# Altium PCB NB3000XN.PcbDoc (part 35 of 71)
Units mil, origin at the board's own origin, x right, y up, seen from the top; angles counter-clockwise.
Board outline 9527.56 x 6929.77 mil, 6 copper layers (Top Layer, GND+SHIELD, MidLayer1, MidLayer2, P2 - 3V3+5V0, Bottom Layer), stack 62.375 mil thick; 832 components, 1027 nets, 4655 pads, 4981 vias.
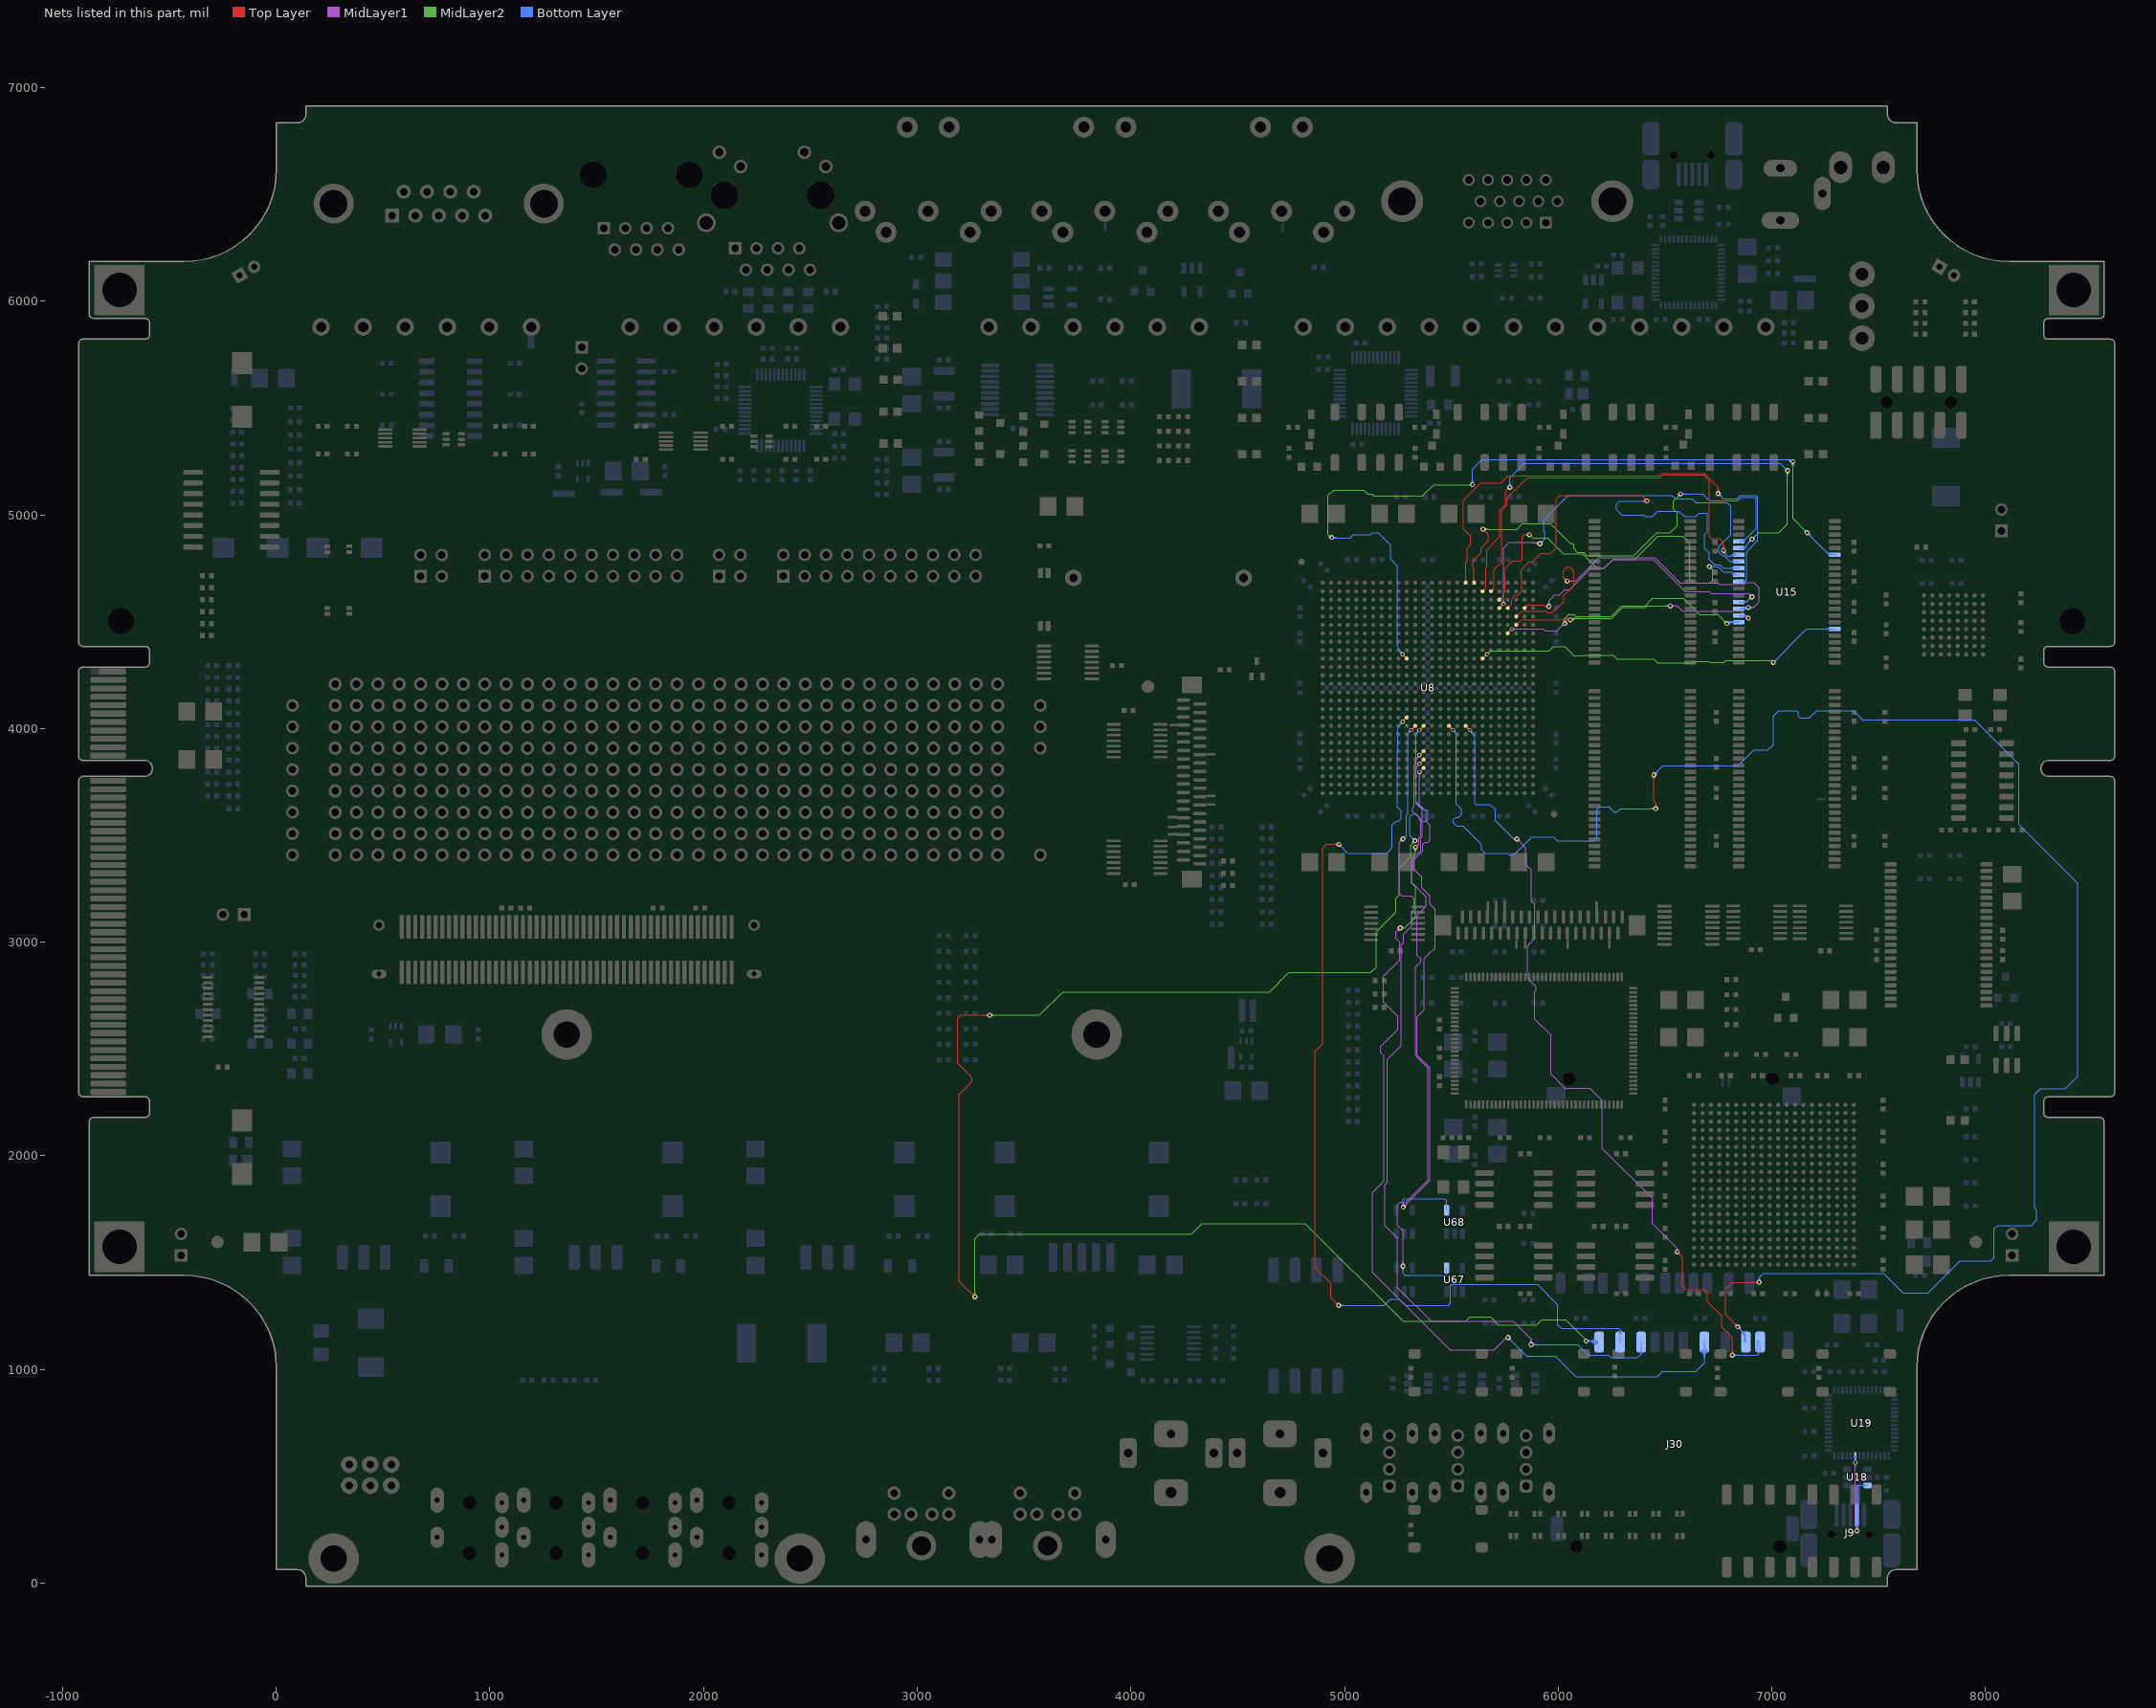
[diagram p39: the nets of this part, all layers, seen from the top]

## Via types
v1: diameter 23, hole 11.81, Top Layer to Bottom Layer, 3672 vias
v2: diameter 26, hole 11.81, Top Layer to Bottom Layer, 461 vias
v3: diameter 19, hole 11.81, Top Layer to Bottom Layer, tented both sides, 396 vias
v4: diameter 23.62, hole 11.81, Top Layer to Bottom Layer, 288 vias
v5: diameter 20, hole 11.81, Top Layer to Bottom Layer, 91 vias
v6: diameter 23, hole 11.81, Top Layer to Bottom Layer, tented both sides, 50 vias
v7: diameter 31, hole 11.81, Top Layer to Bottom Layer, 15 vias
v8: diameter 27.56, hole 11.81, Top Layer to Bottom Layer, tented both sides, 4 vias
v9: diameter 29, hole 11.81, Top Layer to Bottom Layer, 3 vias
v10: diameter 21, hole 11.81, Top Layer to Bottom Layer, 1 vias

## Nets (pads, with @x,y where several pads share a name; then routed paths per layer and width w, separated by ;. In a path a pad name is that pad's centre, name@x,y a point inside that pad or via, vN(x,y) a via of type N, cw(c..) or ccw(c..) an arc to the next point about the centre after c; other vN are vias at no path point) (continued)
DB_SRAM2.D8: U8.G23 U15.29 | length 1778.3
  Top Layer w4: U8.G23@5764.02,4445.91 v3(5783.7,4465.59) ; U8.G23@5764.02,4453.25 ccw(c5764.02,4470.97) 5776.55,4458.44 ccw(c5789.08,4445.91) U8.G23@5771.36,4445.91 ; U8.G23@5764.02,4453.41 ccw(c5764.02,4471.51) 5776.82,4458.71 ccw(c5789.62,4445.91) U8.G23@5771.52,4445.91 ; 5770.9,4452.79 cw(c5783.7,4439.98) 5783.7,4458.09 ccw(c5783.7,4439.98) 5770.9,4452.79 ; 5770.9,4452.79 ccw(c5758.09,4465.59) 5776.2,4465.59 cw(c5758.09,4465.59) 5770.9,4452.79
  MidLayer1 w4: v3(5783.7,4465.59) 5861.38,4465.59 5910,4465.59 5920,4465.59 5924.74,4465.59 5928.74,4465.59 5931.86,4465.59 5931.86,4465.37 5938.86,4458.37 5992.86,4458.37 6026.19,4491.71 v1(6031.86,4491.71) ; v3@5788.89,4460.4 cw(c5801.43,4447.86) 5801.43,4465.59 cw(c5801.43,4483.32) v3@5788.89,4470.78 ; 6005.97,4471.48 cw(c6031.86,4445.59) v1@6031.86,4482.21 ; 6012.79,4478.31 cw(c6031.86,4459.25) v1@6031.86,4486.21 ; 6019.62,4485.14 cw(c6031.86,4472.91) v1@6031.86,4490.21 ; 6019.65,4485.16 ccw(c6013.1,4491.71) v1@6022.36,4491.71 ; 5801.81,4465.59 cw(c5801.81,4483.7) 5789,4470.89 ccw(c5801.81,4483.7) 5801.81,4465.59 ; 5801.81,4465.59 ccw(c5801.81,4447.48) 5789,4460.29 cw(c5801.81,4447.48) 5801.81,4465.59
  MidLayer2 w4: v1@6025.14,4498.43 ccw(c6008.92,4514.64) 6031.86,4514.64 ccw(c6054.79,4514.64) v1@6038.57,4498.43 ; v1@6027.97,4495.6 ccw(c6018.58,4504.99) 6031.86,4504.99 ccw(c6045.14,4504.99) v1@6035.75,4495.6 ; v1(6031.86,4491.71) 6031.86,4516.71 6048.52,4533.37 6073.52,4533.37 6081.86,4525.04 6248.52,4525.04 6298.52,4575.04 6406.86,4575.04 6441.52,4609.71 6585.88,4609.71 6640.29,4555.29 ; 6640,4555 6661.29,4533.71 6747.19,4533.71 v1(6789.19,4491.71) ; v1@6779.69,4491.71 ccw(c6756.76,4491.71) 6772.97,4507.93 ccw(c6789.19,4524.14) v1@6789.19,4501.21 ; v1@6783.69,4491.71 ccw(c6770.41,4491.71) 6779.8,4501.1 ccw(c6789.19,4510.49) v1@6789.19,4497.21
  Bottom Layer w4: v1@6787.42,4493.48 cw(c6803.27,4477.63) 6803.27,4500.04 ; v1(6789.19,4491.71) 6797.52,4500.04 6845.59,4500.04 6848.52,4500.04 6848.52,4498.27 U15.29@6845.59,4498.27 ; v1@6790.25,4490.65 cw(c6812.93,4467.97) 6812.93,4500.04 ; v1@6793.08,4487.82 cw(c6822.59,4458.31) U15.29@6822.59,4500.04 ; v1@6795.91,4484.99 cw(c6832.24,4448.66) U15.29@6832.24,4500.04 ; 6804.43,4500.04 cw(c6804.43,4474.67) U15.29@6822.37,4492.61 ; 6813,4500.04 ccw(c6813,4513.3) U15.29@6822.37,4503.92 ; 6814.09,4500.04 cw(c6814.09,4484.33) U15.29@6825.2,4495.44
DB_SRAM2.D9: U8.F24 U15.30 | length 1657.7
  Top Layer w4: 6036.02,4516.71 cw(c6036.02,4499.6) v1@6051.79,4506.24 ; 6042.05,4516.71 cw(c6042.05,4502.14) v1@6055.47,4507.79 ; 6048.07,4516.71 cw(c6048.07,4504.68) v1@6059.16,4509.34 ; v1@6048.1,4504.69 ccw(c6030,4497.07) 6030,4516.71 ; v1(6056.86,4508.37) 6048.52,4516.71 6030,4516.71 ; 5815.92,4497.81 cw(c5843.27,4470.46) 5843.27,4509.14 ; 5815.92,4497.81 cw(c5843.27,4470.46) 5843.27,4509.14 ; 5815.92,4497.81 cw(c5803.39,4510.34) 5803.39,4492.62 ccw(c5803.39,4510.34) 5815.92,4497.81 ; 5815.92,4497.81 ccw(c5828.45,4485.28) 5810.73,4485.28 cw(c5828.45,4485.28) 5815.92,4497.81 ; 5843.27,4509.14 5910,4509.14 5920,4509.14 5924.74,4509.14 6022.43,4509.14 6030,4516.71
  MidLayer1 w4: v1(6525.19,4573.37) 6558.52,4573.37 6581.86,4550.04 6856.86,4550.04 v1(6890.19,4516.71) ; v1@6529.08,4569.49 cw(c6538.47,4560.1) 6538.47,4573.37 cw(c6538.47,4586.65) v1@6529.08,4577.26 ; v1@6531.91,4566.66 cw(c6548.13,4550.44) 6548.13,4573.37 cw(c6548.13,4596.31) v1@6531.91,4580.09 ; v1@6880.69,4516.71 ccw(c6857.76,4516.71) 6873.97,4532.93 ccw(c6890.19,4549.14) v1@6890.19,4526.21 ; v1@6884.69,4516.71 ccw(c6871.41,4516.71) 6880.8,4526.1 ccw(c6890.19,4535.49) v1@6890.19,4522.21
  MidLayer2 w4: v1@6055.09,4510.14 cw(c6070.94,4494.29) 6070.94,4516.71 ; v1(6056.86,4508.37) 6065.19,4516.71 6251.52,4516.71 6301.52,4566.71 6405,4566.71 6409.84,4566.71 6416.51,4573.37 v1(6525.19,4573.37) v1@6518.52,4566.71 ; v1@6057.92,4507.31 cw(c6080.6,4484.64) 6080.6,4516.71 ; v1@6060.75,4504.49 cw(c6090.25,4474.98) 6090.25,4516.71 ; v1@6063.57,4501.66 cw(c6099.91,4465.32) 6099.91,4516.71 ; v1@6518.47,4566.66 ccw(c6502.26,4550.44) 6502.26,4573.37 ccw(c6502.26,4596.31) v1@6518.47,4580.09 ; v1@6521.3,4569.49 ccw(c6511.91,4560.1) 6511.91,4573.37 ccw(c6511.91,4586.65) v1@6521.3,4577.26
  Bottom Layer w4: U15.30@6845.59,4529.76 6877.14,4529.76 ; U15.30@6870.05,4525.71 cw(c6877.14,4521.54) 6877.14,4529.76 ; U15.30@6870.05,4533.82 ccw(c6877.14,4537.99) 6877.14,4529.76 ; v1(6890.19,4516.71) 6877.14,4529.76
DB_SRAM2.D10: U8.E24 U15.31 | length 2064.2
  Top Layer w4: v1@6032.36,4690.04 ccw(c6009.42,4690.04) 6025.64,4706.26 ccw(c6041.86,4722.48) v1@6041.86,4699.54 ; v1@6036.36,4690.04 ccw(c6023.08,4690.04) 6032.47,4699.43 ccw(c6041.86,4708.82) v1@6041.86,4695.54 ; v1(6041.86,4690.04) 6023.52,4708.37 6023.52,4737.71 6040.82,4755 6053.23,4755 6073.52,4734.71 6073.52,4670.71 6026.19,4623.37 6026.19,4594.37 5973.52,4541.71 5947.98,4541.71 5941.18,4548.51 5924.74,4548.51 5920,4548.51 5910,4548.51 5843.27,4548.51 ; 5815.92,4537.18 cw(c5843.27,4509.83) 5843.27,4548.51 ; 5815.92,4537.18 cw(c5843.27,4509.83) 5843.27,4548.51 ; 5815.92,4537.18 cw(c5803.39,4549.71) 5803.39,4531.99 ccw(c5803.39,4549.71) 5815.92,4537.18 ; 5815.92,4537.18 ccw(c5828.45,4524.65) 5810.73,4524.65 cw(c5828.45,4524.65) 5815.92,4537.18
  MidLayer1 w4: v1(6041.86,4690.04) 6083.19,4690.04 6193.19,4800.04 6452.86,4800.04 6571.19,4681.71 6748.52,4681.71 6755.19,4675.04 6873.52,4675.04 6881.86,4683.37 6915.19,4683.37 6940.19,4658.37 6940.19,4591.71 6915.19,4566.71 v1(6890.19,4566.71) ; v1@6045.75,4686.15 cw(c6055.14,4676.76) 6055.14,4690.04 cw(c6055.14,4703.32) v1@6045.75,4693.93 ; v1@6048.57,4683.32 cw(c6064.79,4667.11) 6064.79,4690.04 cw(c6064.79,4712.98) v1@6048.57,4696.76 ; v1@6894.08,4562.82 cw(c6903.47,4553.43) 6903.47,4566.71 cw(c6903.47,4579.99) v1@6894.08,4570.6 ; v1@6896.91,4559.99 cw(c6913.13,4543.77) 6913.13,4566.71 cw(c6913.13,4589.64) v1@6896.91,4573.43
  Bottom Layer w4: U15.31@6845.59,4561.26 6884.74,4561.26 v1(6890.19,4566.71) ; U15.31@6854.1,4561.26 ccw(c6854.1,4602.8) v1@6883.47,4573.43 ; U15.31@6863.76,4561.26 ccw(c6863.76,4593.14) v1@6886.3,4570.6 ; U15.31@6868.81,4555.6 cw(c6882.46,4541.94) 6882.46,4561.26 cw(c6882.46,4580.57) U15.31@6868.81,4566.92 ; 6873.41,4561.26 ccw(c6873.41,4583.48) v1@6889.13,4567.77
DB_SRAM2.D11: U8.D25 U15.32 | length 1589
  Top Layer w4: v1@5948.52,4567.16 ccw(c5940.86,4562.98) 5940.86,4571.71 ; v1@5948.52,4576.26 cw(c5940.86,4580.43) 5940.86,4571.71 ; v1(5956.86,4571.71) 5940.86,4571.71 ; 5855.29,4576.55 cw(c5862.47,4569.37) 5862.47,4579.52 ; 5855.29,4576.55 cw(c5862.47,4569.37) 5862.47,4579.52 ; 5855.29,4576.55 ccw(c5867.83,4564.02) 5850.1,4564.02 cw(c5867.83,4564.02) 5855.29,4576.55 ; 5855.29,4576.55 cw(c5842.76,4589.08) 5842.76,4571.36 ccw(c5842.76,4589.08) 5855.29,4576.55 ; 5862.47,4579.52 5910,4579.52 5920,4579.52 5924.74,4579.52 5933.04,4579.52 5940.86,4571.71
  MidLayer1 w4: v1@5950.14,4578.43 ccw(c5933.92,4594.64) 5956.86,4594.64 ccw(c5979.79,4594.64) v1@5963.57,4578.43 ; v1@5952.97,4575.6 ccw(c5943.58,4584.99) 5956.86,4584.99 ccw(c5970.14,4584.99) v1@5960.75,4575.6 ; v1(5956.86,4571.71) 5956.86,4597.71 5984.19,4625.04 6006.86,4625.04 6031.86,4650.04 6054.52,4650.04 6154.52,4750.04 6215.19,4750.04 6256.86,4791.71 6445.19,4791.71 6595.19,4641.71 6706.86,4641.71 6715.19,4633.37 6890.19,4633.37 v1(6906.86,4616.71) ; v1@6897.36,4616.71 ccw(c6874.42,4616.71) 6890.64,4632.93 ccw(c6906.86,4649.14) v1@6906.86,4626.21 ; v1@6901.36,4616.71 ccw(c6888.08,4616.71) 6897.47,4626.1 ccw(c6906.86,4635.49) v1@6906.86,4622.21
  Bottom Layer w4: U15.32@6845.59,4592.75 6882.9,4592.75 v1(6906.86,4616.71) ; U15.32@6868.81,4587.1 cw(c6882.46,4573.44) 6882.46,4592.75 cw(c6882.46,4612.07) U15.32@6868.81,4598.41 ; v1@6897.36,4616.71 cw(c6874.42,4616.71) 6890.64,4600.49 cw(c6906.86,4584.27) v1@6906.86,4607.21 ; v1@6901.36,4616.71 cw(c6888.08,4616.71) 6897.47,4607.32 cw(c6906.86,4597.93) v1@6906.86,4611.21
DB_SRAM2.D12: U8.A18 U15.35 | length 2578.4
  Top Layer w4: U8.A18@5561.86,4687.43 ccw(c5549.06,4700.23) 5567.17,4700.23 ccw(c5585.27,4700.23) U8.A18@5572.47,4687.43 ; U8.A18@5561.97,4687.32 ccw(c5549.44,4699.85) 5567.17,4699.85 ccw(c5584.89,4699.85) U8.A18@5572.36,4687.32 ; U8.A18@5567.17,4682.13 5567.17,4710 5567.17,4720 5567.17,4724.74 5567.17,4777.64 5574.52,4785 5574.52,4845.71 5590.19,4861.37 5590.19,4900.04 5558.52,4931.71 5556.52,4933.71 5556.52,5068.35 5638.21,5150.04 5731.86,5150.04 5765.19,5183.37 6475.35,5183.37 6486.69,5194.71 6683.21,5194.71 6699.27,5178.64 6748.52,5129.39 v1(6748.52,5100.04) ; v1@6741.81,5106.76 ccw(c6725.59,5122.98) 6748.52,5122.98 ccw(c6771.46,5122.98) v1@6755.24,5106.76 ; v1@6744.64,5103.93 ccw(c6735.25,5113.32) 6748.52,5113.32 ccw(c6761.8,5113.32) v1@6752.41,5103.93
  Bottom Layer w4: v1@6748.52,5090.54 cw(c6748.52,5067.61) 6764.74,5083.82 cw(c6780.96,5100.04) v1@6758.02,5100.04 ; v1@6748.52,5094.54 cw(c6748.52,5081.26) 6757.91,5090.65 cw(c6767.3,5100.04) v1@6754.02,5100.04 ; v1(6748.52,5100.04) 6773.52,5075.04 6822.52,5075.04 6837.21,5075.04 6853.88,5091.71 6924.52,5091.71 6934.52,5081.71 6934.52,4880.71 6881.86,4828.04 6881.86,4695.24 ; U15.35@6845.59,4687.24 6873.86,4687.24 6881.86,4695.24 ; U15.35@6863.15,4687.24 ccw(c6868.38,4695) 6875,4688.38 ; U15.35@6865.39,4690.56 ccw(c6871.15,4699.09) 6878.43,4691.81 ; U15.35@6867.62,4693.87 ccw(c6873.91,4703.19) 6881.86,4695.24
DB_SRAM2.D13: U8.C22 U15.36 | length 2161.1
  Top Layer w4: 5804.97,4785.01 5801.16,4785.01 ; 5831.86,4855.37 5831.86,4790.71 5831.52,4790.37 ; v1@5858.47,4900.32 ccw(c5842.26,4884.11) 5842.26,4907.04 ccw(c5842.26,4929.98) v1@5858.47,4913.76 ; v1@5861.3,4903.15 ccw(c5851.91,4893.76) 5851.91,4907.04 ccw(c5851.91,4920.32) v1@5861.3,4910.93 ; v1@5873.52,4905.37 5871.86,4907.04 v1(5865.19,4907.04) 5841.84,4907.04 5831.52,4896.73 5831.52,4790.37 ; 5737.18,4615.92 ccw(c5709.83,4643.27) 5748.51,4643.27 ; 5737.18,4615.92 ccw(c5709.83,4643.27) 5748.51,4643.27 ; 5737.18,4615.92 ccw(c5749.71,4603.39) 5731.99,4603.39 cw(c5749.71,4603.39) 5737.18,4615.92 ; 5737.18,4615.92 cw(c5724.65,4628.45) 5724.65,4610.73 ccw(c5724.65,4628.45) 5737.18,4615.92 ; 5748.51,4643.27 5748.51,4710 5748.51,4720 5748.51,4724.74 5748.51,4732.36 5748.51,4746.44 5787.08,4785.01 5801.16,4785.01 ; 5801.19,4785.04 5826.19,4785.04 5831.52,4790.37
  MidLayer2 w4: 5873.52,4898.71 v1(5865.19,4907.04) 5880.86,4891.37 5951.15,4891.37 6025.49,4817.04 6065,4817.04 6115,4817.04 6182,4750.04 6215.04,4750.04 6256.71,4791.71 6359.19,4791.71 6467.52,4900.04 6581.86,4900.04 6615.19,4866.71 6615.19,4700.04 6633.52,4681.71 6710,4681.71 6723.52,4695.23 6723.52,4741.71 v1(6706.86,4758.37) ; v1@6706.86,4748.87 cw(c6706.86,4725.94) 6723.07,4742.16 cw(c6739.29,4758.37) v1@6716.36,4758.37 ; v1@6706.86,4752.87 cw(c6706.86,4739.6) 6716.25,4748.99 cw(c6725.64,4758.37) v1@6712.36,4758.37
  Bottom Layer w4: v1(6706.86,4758.37) 6747.19,4758.37 6773.52,4732.04 6810,4732.04 6823.3,4718.74 U15.36@6845.59,4718.74 ; v1@6710.75,4754.49 cw(c6720.14,4745.1) 6720.14,4758.37 cw(c6720.14,4771.65) v1@6710.75,4762.26 ; v1@6713.57,4751.66 cw(c6729.79,4735.44) 6729.79,4758.37 cw(c6729.79,4781.31) v1@6713.57,4765.09 ; 6812.37,4729.68 ccw(c6821.75,4739.06) U15.36@6825.67,4726.38 ; 6817.06,4724.99 ccw(c6823.96,4731.89) U15.36@6826.85,4722.56 ; 6817.72,4724.32 cw(c6812.14,4718.74) U15.36@6820.03,4718.74
DB_SRAM2.D14: U8.D23 U15.37 | length 2295.3
  Top Layer w4: v1@6405.69,5065.37 ccw(c6382.76,5065.37) 6398.97,5081.59 ccw(c6415.19,5097.81) v1@6415.19,5074.87 ; v1@6409.69,5065.37 ccw(c6396.41,5065.37) 6405.8,5074.76 ccw(c6415.19,5084.15) v1@6415.19,5070.87 ; v1(6415.19,5065.37) 6388.86,5091.71 6006.86,5091.71 5990.19,5075.04 5990.19,4845.44 5962.25,4817.5 5947.75,4817.5 5945.25,4820 5919.9,4820 5879.44,4779.54 5864.34,4779.54 5827.25,4742.45 5827.25,4720 5827.25,4710 5827.25,4643.27 cw(c5817.1,4643.27) 5824.28,4636.09 5824.27,4635.87 5816.36,4627.95 cw(c5803.39,4642.76) 5803.39,4623.07 ccw(c5803.39,4603.38) 5783.7,4603.39 5783.7,4591.94 cw(c5764.02,4591.94) 5777.94,4578.03 5777.94,4577.94 5776.55,4576.55 ; 5776.55,4576.55 ccw(c5789.08,4564.02) 5771.36,4564.02 cw(c5789.08,4564.02) 5776.55,4576.55 ; 5776.55,4576.55 cw(c5764.02,4589.08) 5764.02,4571.36 ccw(c5764.02,4589.08) 5776.55,4576.55
  Bottom Layer w4: v1@6408.47,5058.66 ccw(c6392.26,5042.44) 6392.26,5065.37 ccw(c6392.26,5088.31) v1@6408.47,5072.09 ; v1@6411.3,5061.49 ccw(c6401.91,5052.1) 6401.91,5065.37 ccw(c6401.91,5078.65) v1@6411.3,5069.26 ; v1(6415.19,5065.37) 6288.52,5065.37 6273.52,5050.37 6273.52,5025.04 6298.52,5000.04 6398.52,5000.04 6406.86,4991.71 6440.19,4991.71 6465.19,5016.71 6565.19,5016.71 6590.19,4991.71 6644.86,4991.71 6661.52,5008.37 6690.86,5008.37 6698.52,5000.71 6698.52,4920.71 6684.52,4906.71 6684.52,4843.37 6706.86,4821.04 6706.86,4791.71 6731.86,4766.71 6757.05,4766.71 6773.52,4750.23 U15.37@6845.59,4750.23 ; U15.37@6822.37,4744.58 ccw(c6808.72,4730.92) 6808.72,4750.23 ccw(c6808.72,4769.55) U15.37@6822.37,4755.89
DB_SRAM2.D15: U8.D22 U15.38 | length 2252.5
  Top Layer w4: U8.D22@5724.65,4564.02 v3(5744.33,4583.7) ; U8.D22@5724.65,4571.36 ccw(c5724.65,4589.08) 5737.18,4576.55 ccw(c5749.71,4564.02) U8.D22@5731.99,4564.02 ; U8.D22@5724.65,4571.52 ccw(c5724.65,4589.62) 5737.45,4576.82 ccw(c5750.25,4564.02) U8.D22@5732.15,4564.02 ; 5731.53,4570.9 cw(c5744.33,4558.09) 5744.33,4576.2 ccw(c5744.33,4558.09) 5731.53,4570.9 ; 5731.53,4570.9 ccw(c5718.72,4583.7) 5736.83,4583.7 cw(c5718.72,4583.7) 5731.53,4570.9
  MidLayer1 w4: v3@5739.14,4588.89 ccw(c5726.6,4601.43) 5744.33,4601.43 ccw(c5762.06,4601.43) v3@5749.52,4588.89 ; v3(5744.33,4583.7) 5744.33,4661.38 5744.33,4710 5744.33,4720 5744.33,4845.22 5771.82,4872.71 5877.33,4872.71 5880,4870.04 ; 5889.63,4870.04 cw(c5889.63,4839.74) v1@5911.1,4861.12 ; 5899.26,4870.04 cw(c5899.26,4849.32) v1@5913.94,4863.94 ; 5904.23,4870.04 ccw(c5904.23,4875.77) v1@5908.28,4871.72 ; v1@5908.27,4858.3 ccw(c5880,4830.15) 5880,4870.04 ; v1@5915,4867.56 5912.52,4870.04 5880,4870.04 ; 5744.33,4601.81 cw(c5726.22,4601.81) 5739.03,4589 ccw(c5726.22,4601.81) 5744.33,4601.81 ; 5744.33,4601.81 ccw(c5762.44,4601.81) 5749.63,4589 cw(c5762.44,4601.81) 5744.33,4601.81
  Bottom Layer w4: v1(5915,4865) 5937.5,4887.5 5937.5,4917.25 5931.86,4922.89 5931.86,4977.39 6046.17,5091.71 6531.86,5091.71 6548.52,5075.04 6627.17,5075.04 6643.84,5058.37 6790.86,5058.37 6807.52,5041.71 6807.52,4908.37 6752.86,4853.71 6752.86,4825.04 6769.52,4808.37 6777.21,4808.37 6803.86,4781.73 U15.38@6845.59,4781.73 ; v1@5915,4870.5 ccw(c5915,4883.78) 5924.39,4874.39 ccw(c5933.78,4865) v1@5920.5,4865 ; v1@5915,4874.5 ccw(c5915,4897.43) 5931.22,4881.22 ccw(c5947.43,4865) v1@5924.5,4865 ; U15.38@6822.37,4776.07 ccw(c6808.72,4762.42) 6808.72,4781.73 ccw(c6808.72,4801.04) U15.38@6822.37,4787.39
DB_SRAM2.NBHE: U8.B20 U15.40 | length 2900.4
  Top Layer w4: v1@5764.02,5129.04 cw(c5741.09,5129.04) 5757.31,5112.82 cw(c5773.52,5096.61) v1@5773.52,5119.54 ; v1@5768.02,5129.04 cw(c5754.75,5129.04) 5764.14,5119.65 cw(c5773.52,5110.26) v1@5773.52,5123.54 ; v1(5773.52,5129.04) 5753,5108.52 5753,5048.87 5727.52,5023.39 5727.52,4898.58 5665.19,4836.25 5665.19,4770 5665.19,4755.91 5661.41,4752.13 5661.41,4751.22 5661.41,4745 5661.41,4720 5661.41,4710 5661.41,4662.47 ; 5658.44,4655.29 ccw(c5651.26,4662.47) 5661.41,4662.47 ; 5658.44,4655.29 ccw(c5651.26,4662.47) 5661.41,4662.47 ; 5658.44,4655.29 cw(c5645.91,4667.83) 5645.91,4650.1 ccw(c5645.91,4667.83) 5658.44,4655.29 ; 5658.44,4655.29 ccw(c5670.97,4642.76) 5653.25,4642.76 cw(c5670.97,4642.76) 5658.44,4655.29
  MidLayer2 w4: v1(6906.86,4886.71) 6937.19,4917.04 7032.52,4917.04 ; v1@6906.86,4892.21 ccw(c6906.86,4905.49) 6916.25,4896.1 ccw(c6925.64,4886.71) v1@6912.36,4886.71 ; v1@6906.86,4896.21 ccw(c6906.86,4919.14) 6923.07,4902.93 ccw(c6939.29,4886.71) v1@6916.36,4886.71 ; v1@7066.81,5200.99 cw(c7050.59,5184.77) 7073.52,5184.77 cw(c7096.46,5184.77) v1@7080.24,5200.99 ; v1@7069.64,5203.82 cw(c7060.25,5194.43) 7073.52,5194.43 cw(c7086.8,5194.43) v1@7077.41,5203.82 ; v1(7073.52,5207.71) 7073.52,4958.04 7044.59,4929.11 ; 7032.52,4917.04 7044.59,4929.11 ; 7032.52,4917.04 7044.59,4929.11
  Bottom Layer w4: v1@5766.81,5135.76 ccw(c5750.59,5151.98) 5773.52,5151.98 ccw(c5796.46,5151.98) v1@5780.24,5135.76 ; v1@5769.64,5132.93 ccw(c5760.25,5142.32) 5773.52,5142.32 ccw(c5786.8,5142.32) v1@5777.41,5132.93 ; v1(5773.52,5129.04) 5773.52,5175.04 5840.19,5241.71 7039.52,5241.71 v1(7073.52,5207.71) ; U15.40@6845.59,4844.72 6873.15,4844.72 6881.15,4852.72 ; U15.40@6863.15,4844.72 ccw(c6868.03,4852.04) 6874.25,4845.82 ; U15.40@6865.37,4848.05 ccw(c6870.79,4856.18) 6877.7,4849.27 ; U15.40@6867.59,4851.38 ccw(c6873.55,4860.32) 6881.15,4852.72 ; v1@6897.36,4886.71 cw(c6874.42,4886.71) 6890.64,4870.49 cw(c6906.86,4854.27) v1@6906.86,4877.21 ; v1@6901.36,4886.71 cw(c6888.08,4886.71) 6897.47,4877.32 cw(c6906.86,4867.93) v1@6906.86,4881.21 ; v1(6906.86,4886.71) 6881.15,4861 6881.15,4852.72 ; v1@7064.02,5207.71 ccw(c7041.09,5207.71) 7057.31,5223.93 ccw(c7073.52,5240.14) v1@7073.52,5217.21 ; v1@7068.02,5207.71 ccw(c7054.75,5207.71) 7064.14,5217.1 ccw(c7073.52,5226.49) v1@7073.52,5213.21
DB_SRAM2.NBLE: U8.B21 U15.39 | length 2198.4
  Top Layer w4: v1@6766.81,4840.09 ccw(c6750.59,4856.31) 6773.52,4856.31 ccw(c6796.46,4856.31) v1@6780.24,4840.09 ; v1@6769.64,4837.26 ccw(c6760.25,4846.65) 6773.52,4846.65 ccw(c6786.8,4846.65) v1@6777.41,4837.26 ; v1(6773.52,4833.37) 6773.52,4871.37 6755.19,4889.71 6715.19,4889.71 6706.86,4898.04 6706.86,5159.75 6691.56,5175.04 6679.9,5186.71 6520.19,5186.71 6505,5186.71 6490,5186.71 6478.33,5175.04 5856.86,5175.04 5761,5079.18 5761,5045.56 5735.52,5020.08 5735.52,4778.71 5700.78,4743.97 5700.78,4724.74 5700.78,4720 5700.78,4710 5700.78,4662.47 ; 5697.81,4655.29 ccw(c5690.63,4662.47) 5700.78,4662.47 ; 5697.81,4655.29 ccw(c5690.63,4662.47) 5700.78,4662.47 ; 5697.81,4655.29 cw(c5685.28,4667.83) 5685.28,4650.1 ccw(c5685.28,4667.83) 5697.81,4655.29 ; 5697.81,4655.29 ccw(c5710.34,4642.76) 5692.62,4642.76 cw(c5710.34,4642.76) 5697.81,4655.29
  Bottom Layer w4: v1(6773.52,4833.37) 6773.52,4825.04 6792.34,4806.23 6809.03,4806.23 6816.03,4813.23 ; v1@6774.97,4832.98 ccw(c6787.75,4829.53) 6778.39,4820.17 ; v1@6778.83,4831.94 ccw(c6795.45,4827.46) 6783.28,4815.28 ; v1@6782.7,4830.9 ccw(c6803.15,4825.38) 6788.17,4810.39 ; 6807.64,4804.84 cw(c6820.95,4791.53) U15.39@6826.79,4809.42 ; 6810.03,4807.23 cw(c6816.38,4800.88) U15.39@6822.54,4807.41 ; 6812.25,4809.45 cw(c6823.22,4798.48) 6828.03,4813.23 ccw(c6822.03,4806.87) 6815.86,4813.05 ; 6812.94,4810.14 cw(c6819.21,4803.88) U15.39@6825.29,4810.32 ; 6816.86,4814.06 cw(c6825.49,4805.43) U15.39@6829.27,4817.03 ; U15.39@6820.65,4810.15 ccw(c6816.03,4808.23) 6816.03,4813.23 ; U15.39@6820.65,4816.3 cw(c6816.03,4818.23) 6816.03,4813.23 ; U15.39@6845.59,4813.23 6816.03,4813.23
DB_SRAM2.NCS: U8.K11 U15.6 | length 4588.6
  Top Layer w4: v3(5271.89,4347.48) U8.K11@5291.57,4327.8 ; U8.K11@5284.07,4327.8 ccw(c5265.97,4327.8) 5278.77,4340.6 ccw(c5291.57,4353.4) U8.K11@5291.57,4335.3 ; U8.K11@5284.23,4327.8 ccw(c5266.51,4327.8) 5279.04,4340.33 ccw(c5291.57,4352.86) U8.K11@5291.57,4335.14 ; 5284.69,4334.68 cw(c5297.5,4347.48) 5279.39,4347.48 ccw(c5297.5,4347.48) 5284.69,4334.68 ; 5284.69,4334.68 ccw(c5271.89,4321.87) 5271.89,4339.98 cw(c5271.89,4321.87) 5284.69,4334.68
  MidLayer2 w4: 4925.08,4906.82 ccw(c4933.31,4915.06) v1@4936.99,4904.01 ; 4925.98,4905.92 cw(c4915.05,4895) v1@4930.5,4895 ; 4929.65,4902.25 ccw(c4935.6,4908.2) v1@4938.26,4900.22 ; v1(4940,4895) v1@4940,4891.9 ; v1@4940.19,4891.71 v1@4940,4891.9 ; v1(5598.52,5141.71) 5416.71,5141.71 5363,5088 5138.31,5088 5128.31,5098 5108.56,5098 5089.86,5116.71 4948.52,5116.71 4923.52,5091.71 4923.52,4908.37 4938.45,4893.45 v1@4940,4891.9 ; v1@7091.81,5243.32 cw(c7075.59,5227.11) 7098.52,5227.11 cw(c7121.46,5227.11) v1@7105.24,5243.32 ; v1@7094.64,5246.15 cw(c7085.25,5236.76) 7098.52,5236.76 cw(c7111.8,5236.76) v1@7102.41,5246.15 ; v1(7098.52,5250.04) 7098.52,4983.37 v1(7165.19,4916.71) ; v1@7155.69,4916.71 ccw(c7132.76,4916.71) 7148.97,4932.93 ccw(c7165.19,4949.14) v1@7165.19,4926.21 ; v1@7159.69,4916.71 ccw(c7146.41,4916.71) 7155.8,4926.1 ccw(c7165.19,4935.49) v1@7165.19,4922.21
  Bottom Layer w4: v1(4940,4895) 4940,4891.9 4940.19,4891.71 5024.88,4891.71 5041.54,4908.37 5121.86,4908.37 5130.19,4916.71 5156.86,4916.71 5215.19,4858.37 5215.19,4793.5 5248.03,4760.66 5248.03,4720 5248.03,4710 5248.03,4503.9 5248.03,4484.48 5248.03,4410.36 5248.03,4390.86 ccw(c5289.76,4390.86) 5260.25,4361.35 ; v1@4941.06,4896.06 ccw(c4951.57,4906.57) 4951.57,4891.71 ; v1@4943.89,4898.89 ccw(c4961.23,4916.23) 4961.23,4891.71 ; v1@4946.72,4888.28 cw(c4954.99,4880.01) 4954.99,4891.71 ; v1@4946.72,4901.72 ccw(c4970.88,4925.88) 4970.88,4891.71 ; v3@5264.42,4348.13 ccw(c5246.38,4349.71) 5260.25,4361.35 ; v3@5272.54,4354.95 cw(c5274.12,4372.99) 5260.25,4361.35 ; v1@5591.81,5148.43 ccw(c5575.59,5164.64) 5598.52,5164.64 ccw(c5621.46,5164.64) v1@5605.24,5148.43 ; v1@5594.64,5145.6 ccw(c5585.25,5154.99) 5598.52,5154.99 ccw(c5611.8,5154.99) v1@5602.41,5145.6 ; v1(5598.52,5141.71) 5598.52,5213.73 5643.17,5258.37 7090.19,5258.37 v1(7098.52,5250.04) ; 7055.47,5258.37 cw(c7055.47,5206.99) v1@7091.81,5243.32 ; 7065.13,5258.37 cw(c7065.13,5216.64) v1@7094.64,5246.15 ; 7074.78,5258.37 cw(c7074.78,5226.3) v1@7097.46,5248.98 ; 7084.44,5258.37 cw(c7084.44,5235.96) v1@7100.29,5251.81 ; v1@7165.19,4907.21 cw(c7165.19,4884.27) 7181.41,4900.49 cw(c7197.63,4916.71) v1@7174.69,4916.71 ; v1@7165.19,4911.21 cw(c7165.19,4897.93) 7174.58,4907.32 cw(c7183.97,4916.71) v1@7170.69,4916.71 ; v1(7165.19,4916.71) 7265.19,4816.71 ; 7249.23,4832.67 ccw(c7276.85,4860.29) U15.6@7276.85,4821.23 ; 7256.06,4825.84 ccw(c7276.85,4846.63) U15.6@7276.85,4817.23 ; 7262.89,4819.01 ccw(c7276.85,4832.97) U15.6@7276.85,4813.23 ; 7265.94,4816.71 ccw(c7265.94,4824.14) U15.6@7271.19,4818.88 ; U15.6@7268.85,4813.1 ccw(c7265.19,4813.05) 7265.19,4816.71 ; U15.6@7294.41,4813.23 7298.52,4813.23 7298.52,4816.71 7265.19,4816.71
DB_SRAM2.NOE: U8.A19 U15.41 | length 2467.2
  Top Layer w4: U8.A19@5601.23,4687.43 ccw(c5588.43,4700.23) 5606.54,4700.23 ccw(c5624.64,4700.23) U8.A19@5611.84,4687.43 ; U8.A19@5601.34,4687.32 ccw(c5588.81,4699.85) 5606.54,4699.85 ccw(c5624.26,4699.85) U8.A19@5611.73,4687.32 ; U8.A19@5606.54,4682.13 5606.54,4710 5606.54,4720 5606.54,4724.74 5606.54,4746.05 5600.19,4752.39 5600.19,4782.37 5640.19,4822.37 5640.19,4845.19 5672.86,4877.86 5672.86,4909.04 v1(5648.52,4933.37) ; v1@5648.52,4923.87 cw(c5648.52,4900.94) 5664.74,4917.16 cw(c5680.96,4933.37) v1@5658.02,4933.37 ; v1@5648.52,4927.87 cw(c5648.52,4914.6) 5657.91,4923.99 cw(c5667.3,4933.37) v1@5654.02,4933.37
  MidLayer2 w4: v1(5648.52,4933.37) 5807.11,4933.37 5832.94,4959.21 5963.71,4959.21 6056.21,4866.71 6065.52,4866.71 6073.52,4858.71 6073.52,4842.04 6090.52,4825.04 6118.31,4825.04 6134.98,4808.37 6353.23,4808.37 6461.56,4916.71 6523.52,4916.71 6556.86,4950.04 6556.86,5010.71 6540.19,5027.37 6540.19,5065.04 v1(6572.52,5097.37) ; v1@5652.41,4929.49 cw(c5661.8,4920.1) 5661.8,4933.37 cw(c5661.8,4946.65) v1@5652.41,4937.26 ; v1@5655.24,4926.66 cw(c5671.46,4910.44) 5671.46,4933.37 cw(c5671.46,4956.31) v1@5655.24,4940.09 ; v1@6563.02,5097.37 cw(c6540.09,5097.37) 6556.31,5081.16 cw(c6572.52,5064.94) v1@6572.52,5087.87 ; v1@6567.02,5097.37 cw(c6553.75,5097.37) 6563.14,5087.99 cw(c6572.52,5078.6) v1@6572.52,5091.87
  Bottom Layer w4: v1(6572.52,5097.37) 6676.19,5097.37 6706.86,5066.71 6840.19,5066.71 6856.86,5083.37 6921.54,5083.37 6926.52,5078.39 6926.52,4936.37 6873.52,4883.37 6873.52,4876.22 U15.41@6845.59,4876.22 ; v1@6576.41,5093.49 cw(c6585.8,5084.1) 6585.8,5097.37 cw(c6585.8,5110.65) v1@6576.41,5101.26 ; v1@6579.24,5090.66 cw(c6595.46,5074.44) 6595.46,5097.37 cw(c6595.46,5120.31) v1@6579.24,5104.09 ; U15.41@6863.15,4880.22 ccw(c6863.15,4897.65) 6875.47,4885.32 ; U15.41@6863.15,4884.22 ccw(c6863.15,4911.3) 6882.3,4892.15 ; U15.41@6871.15,4876.22 cw(c6882.69,4876.22) 6874.53,4884.38
DB_SRAM2.NWE: U8.K20 U15.17 | length 1992.2
  Top Layer w4: U8.K20@5645.91,4327.8 v3(5665.59,4347.48) ; U8.K20@5645.91,4335.14 ccw(c5645.91,4352.86) 5658.44,4340.33 ccw(c5670.97,4327.8) U8.K20@5653.25,4327.8 ; U8.K20@5645.91,4335.3 ccw(c5645.91,4353.4) 5658.71,4340.6 ccw(c5671.51,4327.8) U8.K20@5653.41,4327.8 ; 5652.79,4334.68 cw(c5665.59,4321.87) 5665.59,4339.98 ccw(c5665.59,4321.87) 5652.79,4334.68 ; 5652.79,4334.68 ccw(c5639.98,4347.48) 5658.09,4347.48 cw(c5639.98,4347.48) 5652.79,4334.68
  MidLayer2 w4: v3@5666.24,4354.95 ccw(c5667.82,4372.99) 5679.46,4359.12 ccw(c5691.1,4345.25) v3@5673.06,4346.83 ; 5679.17,4358.87 cw(c5689.1,4348.94) 5689.1,4362.99 5782.64,4362.99 5910,4362.99 5920,4362.99 5924.74,4362.99 5956.86,4362.99 5977.24,4383.37 6031.86,4383.37 6074.19,4341.04 6115.19,4341.04 6116.86,4342.71 6256.86,4342.71 6274.52,4325.04 6448.52,4325.04 6465.19,4308.37 6630.52,4308.37 6637.52,4315.37 6705.19,4315.37 6711.19,4309.37 6774.19,4309.37 6783.52,4318.71 6997.52,4318.71 v1(7006.86,4309.37)
  Bottom Layer w4: v1(7006.86,4309.37) 7147.52,4450.04 7164.25,4466.77 U15.17@7294.41,4466.77 ; v1@7006.86,4314.87 ccw(c7006.86,4328.15) 7016.25,4318.76 ccw(c7025.64,4309.37) v1@7012.36,4309.37 ; v1@7006.86,4318.87 ccw(c7006.86,4341.81) 7023.07,4325.59 ccw(c7039.29,4309.37) v1@7016.36,4309.37 ; U15.17@7271.19,4461.11 ccw(c7257.54,4447.46) 7257.54,4466.77 ccw(c7257.54,4486.08) U15.17@7271.19,4472.43
DBSD.CLK: J30.5 U8.AA13 | length 5282.7
  Top Layer w4: v3(5350.63,3875.04) U8.AA13@5370.31,3894.72 ; U8.AA13@5362.81,3894.72 cw(c5344.71,3894.72) 5357.51,3881.92 cw(c5370.31,3869.12) U8.AA13@5370.31,3887.22 ; U8.AA13@5362.97,3894.72 cw(c5345.25,3894.72) 5357.78,3882.19 cw(c5370.31,3869.66) U8.AA13@5370.31,3887.38 ; 5363.43,3887.84 ccw(c5376.24,3875.04) 5358.13,3875.04 cw(c5376.24,3875.04) 5363.43,3887.84 ; 5363.43,3887.84 cw(c5350.63,3900.65) 5350.63,3882.54 ccw(c5350.63,3900.65) 5363.43,3887.84
  MidLayer1 w4: 5242.34,2902.19 5181.86,2841.71 5181.86,2720.35 5249.81,2652.4 5249.81,2592.31 5169.19,2511.69 5169.19,2483.35 5184.4,2468.14 5184.4,1881.84 5131.86,1829.29 5131.86,1454.04 5494.19,1091.71 5700.78,1091.71 5759.11,1150.04 v1(5765.19,1150.04) ; 5242.38,2902.19 5257.81,2917.62 5257.81,3000.09 5247.5,3010.4 ; 5247.5,3010.4 5240.19,3017.71 5240.19,3046.04 v1(5260.86,3066.71) ; v1@5251.36,3066.71 cw(c5228.42,3066.71) 5244.64,3050.49 cw(c5260.86,3034.27) v1@5260.86,3057.21 ; v1@5255.36,3066.71 cw(c5242.08,3066.71) 5251.47,3057.32 cw(c5260.86,3047.93) v1@5260.86,3061.21 ; 5326.77,3798.23 5326.77,3812.16 ; v1(5331.86,3445.04) 5348.52,3461.71 5348.52,3488.41 5356.86,3496.74 5356.86,3575.04 5323.52,3608.37 5320,3611.9 5320,3630 5326.77,3636.77 5326.77,3660 5326.77,3670 5326.77,3775.13 5326.77,3812.16 ; v1@5331.86,3450.54 ccw(c5331.86,3463.82) 5341.25,3454.43 ccw(c5350.64,3445.04) v1@5337.36,3445.04 ; v1@5331.86,3454.54 ccw(c5331.86,3477.48) 5348.07,3461.26 ccw(c5364.29,3445.04) v1@5341.36,3445.04 ; v3@5343.16,3874.39 cw(c5325.12,3872.81) 5338.99,3861.17 ; v3@5351.28,3867.57 ccw(c5352.86,3849.53) 5338.99,3861.17 ; 5738.6,1129.53 cw(c5765.19,1102.93) v1@5765.19,1140.54 ; 5745.43,1136.35 cw(c5765.19,1116.59) v1@5765.19,1144.54 ; 5752.25,1143.18 cw(c5765.19,1130.25) v1@5765.19,1148.54 ; 5753.27,1144.2 ccw(c5747.43,1150.04) v1@5755.69,1150.04 ; 5326.77,3812.16 5326.77,3831.66 cw(c5368.5,3831.66) 5338.99,3861.17
  MidLayer2 w4: v1(5260.86,3066.71) 5281.86,3066.71 ; v1@5264.99,3063.08 cw(c5273.01,3056.02) 5273.01,3066.71 cw(c5273.01,3077.39) v1@5264.99,3070.34 ; v1@5267.99,3060.44 cw(c5281.86,3048.25) 5281.86,3066.71 ; v1@5267.99,3072.98 ccw(c5281.86,3085.17) 5281.86,3066.71 ; v1@5325.14,3438.32 cw(c5308.92,3422.11) 5331.86,3422.11 cw(c5354.79,3422.11) v1@5338.57,3438.32 ; v1@5327.97,3441.15 cw(c5318.58,3431.76) 5331.86,3431.76 cw(c5345.14,3431.76) v1@5335.75,3441.15 ; v1(5331.86,3445.04) 5331.86,3410.71 5314.19,3393.04 5314.19,3276.04 5331.86,3258.37 5331.86,3116.71 5281.86,3066.71
  Bottom Layer w4: v1@5765.19,1140.54 cw(c5765.19,1117.61) 5781.41,1133.82 cw(c5797.63,1150.04) v1@5774.69,1150.04 ; v1@5765.19,1144.54 cw(c5765.19,1131.26) 5774.58,1140.65 cw(c5783.97,1150.04) v1@5770.69,1150.04 ; v1(5765.19,1150.04) 5837.14,1078.1 5852.23,1063 5986.19,1063 6082.48,966.71 6463.86,966.71 6488.86,991.71 6644.19,991.71 6684.53,1032.04 J30.5@6684.53,1128.35 ; J30.5@6669.79,1087.24 cw(c6634.23,1051.67) 6684.53,1051.67 cw(c6734.82,1051.67) J30.5@6699.26,1087.24 ; J30.5@6672.62,1090.06 cw(c6643.88,1061.33) 6684.53,1061.33 cw(c6725.17,1061.33) J30.5@6696.43,1090.06 ; J30.5@6675.45,1092.89 cw(c6653.54,1070.98) 6684.53,1070.98 cw(c6715.51,1070.98) J30.5@6693.6,1092.89
DBSD.CMD: J30.2 U8.V12 | length 4520.7
  Top Layer w4: v3(5311.26,3993.15) U8.V12@5330.94,4012.83 ; U8.V12@5323.44,4012.83 cw(c5305.34,4012.83) 5318.14,4000.03 cw(c5330.94,3987.23) U8.V12@5330.94,4005.33 ; U8.V12@5323.6,4012.83 cw(c5305.88,4012.83) 5318.41,4000.3 cw(c5330.94,3987.77) U8.V12@5330.94,4005.49 ; 5324.06,4005.95 cw(c5311.26,4018.76) 5311.26,4000.65 ccw(c5311.26,4018.76) 5324.06,4005.95 ; 5324.06,4005.95 ccw(c5336.87,3993.15) 5318.76,3993.15 cw(c5336.87,3993.15) 5324.06,4005.95
  MidLayer1 w4: v1@5264.02,3483.37 cw(c5241.09,3483.37) 5257.31,3467.16 cw(c5273.52,3450.94) v1@5273.52,3473.87 ; v1@5268.02,3483.37 cw(c5254.75,3483.37) 5264.14,3473.99 cw(c5273.52,3464.6) v1@5273.52,3477.87 ; v1(5273.52,3483.37) 5255.86,3465.71 5255.86,3228.37 5267.52,3216.71 5311.84,3216.71 5325.19,3203.36 5325.19,3154.04 5315.19,3144.04 5315.19,3075.04 5277.5,3037.35 5277.5,3000 5265.81,2988.31 5265.81,2517.33 5265.19,2516.71 5242.77,2494.28 5200.4,2451.92 5200.4,1875.21 5190.19,1865 5190.19,1675.04 5248.52,1616.71 5248.52,1383.37 5406.86,1225.04 5790.19,1225.04 5873.52,1141.71 v1(5873.52,1116.71) ; v1@5866.81,1123.43 ccw(c5850.59,1139.64) 5873.52,1139.64 ccw(c5896.46,1139.64) v1@5880.24,1123.43 ; v1@5869.64,1120.6 ccw(c5860.25,1129.99) 5873.52,1129.99 ccw(c5886.8,1129.99) v1@5877.41,1120.6
  Bottom Layer w4: v1(5273.52,3483.37) 5290.19,3500.04 5290.19,3594.69 5295.75,3600.25 5295.75,3660 5295.75,3670 5295.75,3876.1 5295.75,3969.64 cw(c5309.8,3969.64) 5299.87,3979.57 ; v1@5273.52,3488.87 ccw(c5273.52,3502.15) 5282.91,3492.76 ccw(c5292.3,3483.37) v1@5279.02,3483.37 ; v1@5273.52,3492.87 ccw(c5273.52,3515.81) 5289.74,3499.59 ccw(c5305.96,3483.37) v1@5283.02,3483.37 ; v3@5303.79,3992.5 cw(c5285.75,3990.92) 5299.62,3979.28 cw(c5313.49,3967.64) v3@5311.91,3985.68 ; v1(5873.52,1116.71) 6091.19,1116.71 6141.19,1066.71 6235,1066.71 6246.71,1055 6370,1055 6388.86,1073.86 ; v1@5877.41,1112.82 cw(c5886.8,1103.43) 5886.8,1116.71 cw(c5886.8,1129.99) v1@5877.41,1120.6 ; v1@5880.24,1109.99 cw(c5896.46,1093.77) 5896.46,1116.71 cw(c5896.46,1139.64) v1@5880.24,1123.43 ; J30.2@6382.79,1082.04 cw(c6380.31,1073.86) 6388.86,1073.86 ; J30.2@6388.86,1128.35 6388.86,1073.86 ; J30.2@6394.92,1082.04 ccw(c6397.4,1073.86) 6388.86,1073.86
DBSD.DAT0: J30.7 U8.V16 | length 9054.7
  Top Layer w4: U8.V16@5488.43,4005.33 cw(c5488.43,3987.23) 5501.23,4000.03 cw(c5514.03,4012.83) U8.V16@5495.93,4012.83 ; U8.V16@5488.43,4005.49 cw(c5488.43,3987.77) 5500.96,4000.3 cw(c5513.49,4012.83) U8.V16@5495.77,4012.83 ; U8.V16@5488.43,4012.83 v3(5508.11,3993.15) ; v1@6441.81,3776.66 cw(c6425.59,3760.44) 6448.52,3760.44 cw(c6471.46,3760.44) v1@6455.24,3776.66 ; v1@6444.64,3779.49 cw(c6435.25,3770.1) 6448.52,3770.1 cw(c6461.8,3770.1) v1@6452.41,3779.49 ; v1(6448.52,3783.37) 6448.52,3660 6456.86,3651.67 v1(6456.86,3625.04) ; v1@6450.14,3631.76 ccw(c6433.92,3647.98) 6456.86,3647.98 ccw(c6479.79,3647.98) v1@6463.57,3631.76 ; v1@6452.97,3628.93 ccw(c6443.58,3638.32) 6456.86,3638.32 ccw(c6470.14,3638.32) v1@6460.75,3628.93 ; v1@6830.69,1200.04 ccw(c6807.76,1200.04) 6823.97,1216.26 ccw(c6840.19,1232.48) v1@6840.19,1209.54 ; v1@6834.69,1200.04 ccw(c6821.41,1200.04) 6830.8,1209.43 ccw(c6840.19,1218.82) v1@6840.19,1205.54 ; v1(6840.19,1200.04) 6783.52,1256.71 6783.52,1375.04 6816.86,1408.37 v1(6940.19,1408.37) ; v1@6933.47,1401.66 ccw(c6917.26,1385.44) 6917.26,1408.37 ccw(c6917.26,1431.31) v1@6933.47,1415.09 ; v1@6936.3,1404.49 ccw(c6926.91,1395.1) 6926.91,1408.37 ccw(c6926.91,1421.65) v1@6936.3,1412.26 ; 5495.31,4005.95 cw(c5482.5,3993.15) 5500.61,3993.15 ccw(c5482.5,3993.15) 5495.31,4005.95 ; 5495.31,4005.95 ccw(c5508.11,4018.76) 5508.11,4000.65 cw(c5508.11,4018.76) 5495.31,4005.95
  Bottom Layer w4: v3@5507.46,3985.68 cw(c5505.88,3967.64) 5519.75,3979.28 cw(c5533.62,3990.92) v3@5515.58,3992.5 ; 5519.5,3979.57 cw(c5509.57,3969.64) 5523.62,3969.64 5523.62,3876.1 5523.62,3670 5523.62,3660 5523.62,3646.37 5546.99,3623 5546.99,3598.01 5533.98,3585 5520,3585 5510,3575 5510,3560 5525,3545 5553.69,3545 5553.69,3544.9 5641.9,3456.69 5641.9,3433.1 5657.92,3417.08 5762.44,3417.08 5769.98,3409.55 5794.34,3409.55 5876.67,3491.87 5976.66,3491.87 5994.48,3474.04 6170.21,3474.04 6182.19,3486.02 6182.19,3620.56 6195,3633.37 6238.19,3633.37 6263.19,3608.37 6273.52,3608.37 6290.19,3625.04 v1(6456.86,3625.04) ; v1(6448.52,3783.37) 6490.19,3825.04 6773.52,3825.04 6774.52,3826.04 6841.19,3826.04 6915.19,3900.04 6981.86,3900.04 7006.86,3925.04 7006.86,4058.37 7031.86,4083.37 7115.19,4083.37 7123.52,4075.04 7123.52,4058.37 7131.86,4050.04 7176.5,4050.04 7209.84,4083.37 7381.86,4083.37 7423.52,4041.71 7948.52,4041.71 8156.86,3833.37 8156.86,3550.04 8431.86,3275.04 8431.86,2371.86 8373.94,2313.94 8257.07,2313.94 8230,2286.87 8230,1757.18 8240.19,1746.99 8240.19,1700.04 8215.19,1675.04 8056.86,1675.04 8040.19,1658.37 8040.19,1525.04 8023.52,1508.37 7881.86,1508.37 7731.86,1358.37 7615.19,1358.37 7523.52,1450.04 6959.86,1450.04 6940.19,1430.37 ; v1@6448.52,3788.87 ccw(c6448.52,3802.15) 6457.91,3792.76 ccw(c6467.3,3783.37) v1@6454.02,3783.37 ; v1@6448.52,3792.87 ccw(c6448.52,3815.81) 6464.74,3799.59 ccw(c6480.96,3783.37) v1@6458.02,3783.37 ; v1@6450.14,3618.32 ccw(c6433.92,3602.11) 6433.92,3625.04 ccw(c6433.92,3647.98) v1@6450.14,3631.76 ; v1@6452.97,3621.15 ccw(c6443.58,3611.76) 6443.58,3625.04 ccw(c6443.58,3638.32) v1@6452.97,3628.93 ; v1@6840.19,1190.54 cw(c6840.19,1167.61) 6856.41,1183.82 cw(c6872.63,1200.04) v1@6849.69,1200.04 ; v1@6840.19,1194.54 cw(c6840.19,1181.26) 6849.58,1190.65 cw(c6858.97,1200.04) v1@6845.69,1200.04 ; v1(6840.19,1200.04) 6860.08,1180.16 6860.19,1180.04 6878.23,1162.01 J30.7@6878.23,1128.35 ; 6860.45,1179.78 cw(c6849.82,1169.16) J30.7@6863.22,1162.35 ; 6863.01,1177.22 ccw(c6876.76,1190.97) J30.7@6877.54,1171.55 ; J30.7@6864.35,1175.89 cw(c6854.99,1166.53) J30.7@6866.78,1160.54 ; J30.7@6871.23,1128.35 6871.23,1133.37 6873.52,1133.37 J30.7@6873.52,1166.71 ; v1@6933.68,1415.29 ccw(c6919.47,1430.37) 6940.19,1430.37 ; v1@6936.42,1412.38 ccw(c6928.19,1421.11) 6940.19,1421.11 ccw(c6952.19,1421.11) v1@6943.96,1412.38 ; v1(6940.19,1408.37) 6940.19,1430.37 ; v1@6946.7,1415.29 cw(c6960.91,1430.37) 6940.19,1430.37
DBSD.DAT1: J30.8 U8.V18 | length 4275.8
  Top Layer w4: U8.V18@5567.17,4005.33 cw(c5567.17,3987.23) 5579.97,4000.03 cw(c5592.77,4012.83) U8.V18@5574.67,4012.83 ; U8.V18@5567.17,4005.49 cw(c5567.17,3987.77) 5579.7,4000.3 cw(c5592.23,4012.83) U8.V18@5574.51,4012.83 ; U8.V18@5567.17,4012.83 v3(5586.85,3993.15) ; v1@6556.86,1540.54 cw(c6556.86,1517.61) 6573.07,1533.82 cw(c6589.29,1550.04) v1@6566.36,1550.04 ; v1@6556.86,1544.54 cw(c6556.86,1531.26) 6566.25,1540.65 cw(c6575.64,1550.04) v1@6562.36,1550.04 ; v1(6556.86,1550.04) 6581.86,1525.04 6581.86,1391.71 6598.52,1375.04 6681.86,1375.04 6698.52,1358.37 6698.52,1316.71 6765.19,1250.04 6765.19,1200.04 6815.19,1150.04 v1(6815.19,1066.71) ; v1@6808.47,1073.43 ccw(c6792.26,1089.64) 6815.19,1089.64 ccw(c6838.13,1089.64) v1@6821.91,1073.43 ; v1@6811.3,1070.6 ccw(c6801.91,1079.99) 6815.19,1079.99 ccw(c6828.47,1079.99) v1@6819.08,1070.6 ; 5574.05,4005.95 cw(c5561.24,3993.15) 5579.35,3993.15 ccw(c5561.24,3993.15) 5574.05,4005.95 ; 5574.05,4005.95 ccw(c5586.85,4018.76) 5586.85,4000.65 cw(c5586.85,4018.76) 5574.05,4005.95
  MidLayer1 w4: v1@5806.86,3473.87 cw(c5806.86,3450.94) 5823.07,3467.16 cw(c5839.29,3483.37) v1@5816.36,3483.37 ; v1@5806.86,3477.87 cw(c5806.86,3464.6) 5816.25,3473.99 cw(c5825.64,3483.37) v1@5812.36,3483.37 ; v1(5806.86,3483.37) 5848.52,3441.71 5848.52,3363.85 5874.52,3337.85 5874.52,3191.71 5890.19,3176.04 5890.19,3016.71 5856.86,2983.37 5856.86,2831.46 5897.69,2790.62 5897.69,2776.13 5890.36,2768.79 5890.36,2677.83 5890.19,2677.66 5890.19,2639.34 5965.19,2564.34 5965.19,2383.37 6031.86,2316.71 6148.52,2316.71 6206.86,2258.37 6206.86,2035.37 6440.19,1802.04 6440.19,1683.37 6556.86,1566.71 ; v1@6552.02,1558.22 ccw(c6546.99,1566.71) 6556.86,1566.71 ; v1(6556.86,1550.04) 6556.86,1566.71 ; v1@6561.7,1558.22 cw(c6566.73,1566.71) 6556.86,1566.71
  Bottom Layer w4: v3@5585.55,3985.76 cw(c5582.4,3967.93) 5597.24,3978.32 ; v3@5594.24,3991.85 ccw(c5612.07,3988.7) 5597.24,3978.32 ; v1(5806.86,3483.37) 5791.19,3483.37 5705.52,3569.04 5705.52,3620 5680.15,3645.37 5614.63,3645.37 5610.62,3649.38 5610.62,3660 5610.62,3670 5610.62,3953.78 ccw(c5586.85,3953.78) 5603.66,3970.59 5597.24,3978.32 ; v1(6815.19,1066.71) 6931.71,1066.71 6945.16,1080.16 J30.8@6945.16,1128.35 ; v1@6819.08,1062.82 cw(c6828.47,1053.43) 6828.47,1066.71 cw(c6828.47,1079.99) v1@6819.08,1070.6 ; v1@6821.91,1059.99 cw(c6838.13,1043.77) 6838.13,1066.71 cw(c6838.13,1089.64) v1@6821.91,1073.43 ; J30.8@6931.86,1083.37 6931.86,1128.35 6931.86,1133.37 6938.16,1133.37 J30.8@6938.16,1128.35
DBSD.DAT2: J30.9 U8.V13 | length 9173
  Top Layer w4: v1@3260.5,1340 ccw(c3237.56,1340) 3253.78,1356.22 ccw(c3270,1372.43) v1@3270,1349.5 ; v1@3264.5,1340 ccw(c3251.22,1340) 3260.61,1349.39 ccw(c3270,1358.78) v1@3270,1345.5 ; v1(3270,1340) 3197.19,1412.81 3197.19,2287.81 3256.86,2347.48 3256.86,2365 3189.19,2432.67 3189.19,2644.19 3203.37,2658.37 v1(3339.52,2658.37) ; v1@3332.81,2651.66 ccw(c3316.59,2635.44) 3316.59,2658.37 ccw(c3316.59,2681.31) v1@3332.81,2665.09 ; v1@3335.64,2654.49 ccw(c3326.25,2645.1) 3326.25,2658.37 ccw(c3326.25,2671.65) v1@3335.64,2662.26 ; v3(5350.63,3993.15) U8.V13@5370.31,4012.83 ; U8.V13@5362.81,4012.83 cw(c5344.71,4012.83) 5357.51,4000.03 cw(c5370.31,3987.23) U8.V13@5370.31,4005.33 ; U8.V13@5362.97,4012.83 cw(c5345.25,4012.83) 5357.78,4000.3 cw(c5370.31,3987.77) U8.V13@5370.31,4005.49 ; 5363.43,4005.95 cw(c5350.63,4018.76) 5350.63,4000.65 ccw(c5350.63,4018.76) 5363.43,4005.95 ; 5363.43,4005.95 ccw(c5376.24,3993.15) 5358.13,3993.15 cw(c5376.24,3993.15) 5363.43,4005.95
  MidLayer2 w4: v1@3263.28,1346.72 ccw(c3247.06,1362.93) 3270,1362.93 ccw(c3292.93,1362.93) v1@3276.72,1346.72 ; v1@3266.11,1343.89 ccw(c3256.72,1353.28) 3270,1353.28 ccw(c3283.28,1353.28) v1@3273.89,1343.89 ; v1(3270,1340) 3270,1613.18 3273.52,1616.71 3290.19,1633.37 4284,1633.37 4334,1683.37 4815.19,1683.37 5273.52,1225.04 5567.16,1225.04 5587.4,1245.29 5683.63,1245.29 5720.71,1208.21 5898.01,1208.21 5923,1233.21 6035.73,1233.21 6051.73,1217.21 6130.86,1138.08 v1(6130.86,1133.37) ; v1(3339.52,2658.37) 3573.37,2658.37 3681.71,2766.71 3730,2766.71 4648.52,2766.71 4740.19,2858.37 5122.52,2858.37 5148.52,2884.37 5148.52,3050.04 5240.19,3141.71 5240.19,3205.08 5255.86,3220.75 5255.86,3346.71 5309.19,3400.04 5309.19,3453.71 v1(5330.52,3475.04) ; v1@3343.41,2654.49 cw(c3352.8,2645.1) 3352.8,2658.37 cw(c3352.8,2671.65) v1@3343.41,2662.26 ; v1@3346.24,2651.66 cw(c3362.46,2635.44) 3362.46,2658.37 cw(c3362.46,2681.31) v1@3346.24,2665.09 ; v1@5321.02,3475.04 cw(c5298.09,3475.04) 5314.31,3458.82 cw(c5330.52,3442.61) v1@5330.52,3465.54 ; v1@5325.02,3475.04 cw(c5311.75,3475.04) 5321.13,3465.65 cw(c5330.52,3456.26) v1@5330.52,3469.54
  Bottom Layer w4: v1@5321.02,3475.04 ccw(c5298.09,3475.04) 5314.31,3491.26 ccw(c5330.52,3507.48) v1@5330.52,3484.54 ; v1@5325.02,3475.04 ccw(c5311.75,3475.04) 5321.14,3484.43 ccw(c5330.52,3493.82) v1@5330.52,3480.54 ; v1(5330.52,3475.04) 5306.52,3499.04 5306.52,3588.39 5318.17,3600.04 5334.52,3600.04 5351.19,3583.37 5351.19,3573.37 5357.86,3566.71 5381.86,3566.71 5390.19,3575.04 5390.19,3616.71 5386.9,3620 5370,3620 5335.12,3654.88 5335.12,3660 5335.12,3670 5335.12,3876.1 5335.12,3969.64 cw(c5349.17,3969.64) 5339.24,3979.57 ; v3@5343.16,3992.5 cw(c5325.12,3990.92) 5338.99,3979.28 cw(c5352.86,3967.64) v3@5351.28,3985.68 ; v1@6134.75,1129.49 cw(c6144.14,1120.1) 6144.14,1133.37 cw(c6144.14,1146.65) v1@6134.75,1137.26 ; v1@6137.57,1126.66 cw(c6153.79,1110.44) 6153.79,1133.37 cw(c6153.79,1156.31) v1@6137.57,1140.09 ; v1@6140.32,1133.37 cw(c6140.32,1078.18) J30.9@6179.93,1116.62 ; 6146.85,1133.37 ccw(c6146.85,1166.51) J30.9@6170.27,1143.08 ; 6147.61,1133.37 cw(c6147.61,1098.13) J30.9@6175.02,1120.28 ; 6149.77,1133.37 cw(c6149.77,1087.36) J30.9@6182.8,1119.41 ; 6153.85,1133.37 ccw(c6153.85,1166.51) J30.9@6177.27,1143.08 ; 6155.98,1133.37 cw(c6155.98,1104.9) J30.9@6178.13,1122.79 ; 6156.5,1133.37 ccw(c6156.5,1156.85) J30.9@6173.1,1140.25 ; 6159.23,1133.37 cw(c6159.23,1096.53) J30.9@6185.67,1122.19 ; 6163.5,1133.37 ccw(c6163.5,1156.85) J30.9@6180.1,1140.25 ; 6168.69,1133.37 cw(c6168.69,1105.71) J30.9@6188.54,1124.98 ; J30.9@6177.06,1113.84 ccw(c6130.86,1069) v1(6130.86,1133.37) 6185.01,1133.37 J30.9@6185.01,1128.35
DBSD.DAT3: J30.1 U8.U11 | length 5249.3
  Top Layer w4: v1@4963.02,1300.04 ccw(c4940.09,1300.04) 4956.31,1316.26 ccw(c4972.52,1332.48) v1@4972.52,1309.54 ; v1@4966.81,3451.66 ccw(c4950.59,3435.44) 4950.59,3458.37 ccw(c4950.59,3481.31) v1@4966.81,3465.09 ; v1@4967.02,1300.04 ccw(c4953.75,1300.04) 4963.14,1309.43 ccw(c4972.52,1318.82) v1@4972.52,1305.54 ; v1@4969.64,3454.49 ccw(c4960.25,3445.1) 4960.25,3458.37 ccw(c4960.25,3471.65) v1@4969.64,3462.26 ; v1(4972.52,1300.04) 4936.58,1335.99 4936.58,1402.3 4862,1476.88 4862,2488.52 4865.19,2491.71 4898.52,2525.04 4898.52,3441.71 4915.19,3458.37 v1(4973.52,3458.37) ; v3(5271.89,4032.52) U8.U11@5291.57,4052.2 ; U8.U11@5284.07,4052.2 cw(c5265.97,4052.2) 5278.77,4039.4 cw(c5291.57,4026.6) U8.U11@5291.57,4044.7 ; U8.U11@5284.23,4052.2 cw(c5266.51,4052.2) 5279.04,4039.67 cw(c5291.57,4027.14) U8.U11@5291.57,4044.86 ; 5284.69,4045.32 cw(c5271.89,4058.13) 5271.89,4040.02 ccw(c5271.89,4058.13) 5284.69,4045.32 ; 5284.69,4045.32 ccw(c5297.5,4032.52) 5279.39,4032.52 cw(c5297.5,4032.52) 5284.69,4045.32
  Bottom Layer w4: v1(4972.52,1300.04) 5185,1300.04 5214.96,1330 5255,1330 5285.29,1299.71 5484.71,1299.71 5496.86,1311.86 5496.86,1395 5500.23,1398.37 5902.56,1398.37 5998.52,1302.41 5998.52,1208.37 6015.19,1191.71 6283.29,1191.71 6290.43,1184.57 ; v1@4973.52,3448.87 cw(c4973.52,3425.94) 4989.74,3442.16 cw(c5005.96,3458.37) v1@4983.02,3458.37 ; v1@4973.52,3452.87 cw(c4973.52,3439.6) 4982.91,3448.99 cw(c4992.3,3458.37) v1@4979.02,3458.37 ; v1(4973.52,3458.37) 5015.19,3416.71 5197.52,3416.71 5215.19,3434.37 5223.86,3443.04 5223.86,3547.58 5242.98,3566.71 5252.52,3566.71 5265.19,3579.37 5265.19,3613.18 5248.03,3630.34 5248.03,3660 5248.03,3670 5248.03,3876.1 5248.03,3895.52 5248.03,3969.64 5248.03,3989.14 cw(c5289.76,3989.14) 5260.25,4018.65 ; v1@4976.41,1296.15 cw(c4985.8,1286.76) 4985.8,1300.04 cw(c4985.8,1313.32) v1@4976.41,1303.93 ; v1@4979.24,1293.32 cw(c4995.46,1277.11) 4995.46,1300.04 cw(c4995.46,1322.98) v1@4979.24,1306.76 ; v3@5264.42,4031.87 cw(c5246.38,4030.29) 5260.25,4018.65 ; v3@5272.54,4025.05 ccw(c5274.12,4007.01) 5260.25,4018.65 ; J30.1@6283.25,1174.28 ccw(c6279.47,1184.57) 6290.43,1184.57 ; J30.1@6284.63,1170.53 ccw(c6281.58,1178.84) 6290.43,1178.84 ccw(c6299.28,1178.84) J30.1@6296.23,1170.53 ; J30.1@6290.43,1128.35 6290.43,1184.57 ; J30.1@6297.61,1174.28 cw(c6301.39,1184.57) 6290.43,1184.57
DBSD.DETECT: U8.AC13 U68.4 | length 2936.6
  Top Layer w4: v3(5350.63,3796.3) U8.AC13@5370.31,3815.98 ; U8.AC13@5362.81,3815.98 cw(c5344.71,3815.98) 5357.51,3803.18 cw(c5370.31,3790.38) U8.AC13@5370.31,3808.48 ; U8.AC13@5362.97,3815.98 cw(c5345.25,3815.98) 5357.78,3803.45 cw(c5370.31,3790.92) U8.AC13@5370.31,3808.64 ; 5363.43,3809.1 ccw(c5376.24,3796.3) 5358.13,3796.3 cw(c5376.24,3796.3) 5363.43,3809.1 ; 5363.43,3809.1 cw(c5350.63,3821.91) 5350.63,3803.8 ccw(c5350.63,3821.91) 5363.43,3809.1
  MidLayer1 w4: v1(5274.86,1759.71) 5399.19,1884.04 5399.19,2413.02 5339.86,2472.35 5339.86,2651.33 5373.52,2685 5373.52,2923.19 5395.5,2945.16 5395.5,2945.5 5423.52,2973.53 5423.52,3154.04 5399.19,3178.37 5399.19,3218 5362.5,3254.69 5362.5,3302.73 5356.96,3308.27 5323.52,3341.71 5323.52,3385.71 5365.19,3427.37 5365.19,3457.04 5374.86,3466.71 5390,3466.71 5399.7,3476.41 5399.7,3548.86 5381.86,3566.71 5381.86,3614.35 5350.63,3645.58 5350.63,3660 5350.63,3670 5350.63,3718.62 v3(5350.63,3796.3) ; v3@5345.44,3791.11 cw(c5332.9,3778.57) 5350.63,3778.57 cw(c5368.36,3778.57) v3@5355.82,3791.11 ; 5284.25,1769.1 cw(c5274.86,1778.49) 5274.86,1765.21 ccw(c5274.86,1778.49) 5284.25,1769.1 ; 5284.25,1769.1 ccw(c5293.64,1759.71) 5280.36,1759.71 cw(c5293.64,1759.71) 5284.25,1769.1 ; 5291.07,1775.93 cw(c5274.86,1792.14) 5274.86,1769.21 ccw(c5274.86,1792.14) 5291.07,1775.93 ; 5291.07,1775.93 ccw(c5307.29,1759.71) 5284.36,1759.71 cw(c5307.29,1759.71) 5291.07,1775.93 ; 5350.63,3778.19 cw(c5368.74,3778.19) 5355.93,3791 ccw(c5368.74,3778.19) 5350.63,3778.19 ; 5350.63,3778.19 ccw(c5332.52,3778.19) 5345.33,3791 cw(c5332.52,3778.19) 5350.63,3778.19
  Bottom Layer w4: v1@5268.14,1766.43 ccw(c5251.92,1782.64) 5274.86,1782.64 ccw(c5297.79,1782.64) v1@5281.57,1766.43 ; v1@5270.97,1763.6 ccw(c5261.58,1772.99) 5274.86,1772.99 ccw(c5288.14,1772.99) v1@5278.75,1763.6 ; v1(5274.86,1759.71) 5274.86,1794.86 5280.37,1800.37 5469.63,1800.37 5477.6,1792.4 U68.4@5477.6,1745.12
DBSD.PROTECT: U8.AB13 U67.4 | length 3170.7
  Top Layer w4: v3(5350.63,3835.67) U8.AB13@5370.31,3855.35 ; U8.AB13@5362.81,3855.35 cw(c5344.71,3855.35) 5357.51,3842.55 cw(c5370.31,3829.75) U8.AB13@5370.31,3847.85 ; U8.AB13@5362.97,3855.35 cw(c5345.25,3855.35) 5357.78,3842.82 cw(c5370.31,3830.29) U8.AB13@5370.31,3848.01 ; 5363.43,3848.47 cw(c5350.63,3861.28) 5350.63,3843.17 ccw(c5350.63,3861.28) 5363.43,3848.47 ; 5363.43,3848.47 ccw(c5376.24,3835.67) 5358.13,3835.67 cw(c5376.24,3835.67) 5363.43,3848.47
  MidLayer1 w4: v1(5273.52,1483.37) 5273.52,1650.04 5248.52,1675.04 5248.52,1770 5261.9,1783.37 5287.21,1783.37 5391.19,1887.35 5391.19,2409.71 5385.52,2415.37 5331.86,2469.04 5331.86,2883.37 5356.86,2908.37 5356.86,2923.19 5340.19,2939.85 5340.19,3124.04 5382.86,3166.71 5382.86,3211.71 5315.19,3279.37 5315.19,3388.69 5356.86,3430.36 5356.86,3485.42 5364.86,3493.42 5364.86,3620.04 5335,3649.9 5335,3660 5335,3670 5335,3685 ; 5335.12,3685 5335.12,3812.16 ; 5335.12,3798.23 5335.12,3812.16 ; 5339.24,3822.09 ccw(c5349.17,3812.16) 5335.12,3812.16 ; v3@5343.16,3835.02 cw(c5325.12,3833.44) 5338.99,3821.8 cw(c5352.86,3810.16) v3@5351.28,3828.2 ; 5273.52,1496.65 ccw(c5286.8,1496.65) 5277.41,1487.26 cw(c5286.8,1496.65) 5273.52,1496.65 ; 5273.52,1496.65 cw(c5260.25,1496.65) 5269.64,1487.26 ccw(c5260.25,1496.65) 5273.52,1496.65 ; 5273.52,1506.31 ccw(c5296.46,1506.31) 5280.24,1490.09 cw(c5296.46,1506.31) 5273.52,1506.31 ; 5273.52,1506.31 cw(c5250.59,1506.31) 5266.81,1490.09 ccw(c5250.59,1506.31) 5273.52,1506.31
  Bottom Layer w4: v1@5266.81,1476.66 cw(c5250.59,1460.44) 5273.52,1460.44 cw(c5296.46,1460.44) v1@5280.24,1476.66 ; v1@5269.64,1479.49 cw(c5260.25,1470.1) 5273.52,1470.1 cw(c5286.8,1470.1) v1@5277.41,1479.49 ; v1(5273.52,1483.37) 5273.52,1450 5282.15,1441.37 5473,1441.37 5477.6,1445.97 U67.4@5477.6,1475.12
DBUSB#.DMINUS: J9.2 U18.6 U19.9 | length 842.9
  MidLayer1 w5: v5@7385.17,559.04 cw(c7372.37,546.23) 7390.47,546.23 cw(c7408.58,546.23) v5@7395.78,559.04 ; v5(7390.47,564.34) 7390.47,269.53 7398.5,261.5 ; v4@7393.69,252.97 ccw(c7388.55,261.5) 7398.5,261.5 ; v4@7397.01,243.5 v4(7398.5,245) 7398.5,261.5 ; v4@7403.31,252.97 cw(c7408.46,261.5) 7398.5,261.5
  Bottom Layer w5: v4@7391.92,251.58 ccw(c7376.02,267.48) 7398.5,267.48 ccw(c7420.98,267.48) v4@7405.09,251.58 ; J9.2@7393.31,269.53 cw(c7380.78,257) 7398.5,257 cw(c7416.23,257) J9.2@7403.7,269.53 ; J9.2@7393.31,370.47 ccw(c7380.78,383) 7398.5,383 ccw(c7416.23,383) J9.2@7403.7,370.47 ; v4(7398.5,245) J9.2@7398.5,320 7398.5,451.1 7405,457.6 U18.6@7447.24,457.6 ; U18.6@7433.36,449.62 ccw(c7414.11,430.37) 7414.11,457.6 ccw(c7414.11,484.83) U18.6@7433.36,465.57 ; U18.6@7436.9,453.16 ccw(c7426.18,442.44) 7426.18,457.6 ccw(c7426.18,472.76) U18.6@7436.9,462.04
  Bottom Layer w8: v5@7386.23,568.58 ccw(c7375.99,578.82) 7390.47,578.82 ccw(c7404.96,578.82) v5@7394.72,568.58 ; v5(7390.47,564.34) U19.9@7390.47,595.67